# Altium PCB MainBoardPCB_4.PcbDoc (part 21 of 32)
Units mm, origin at the board's own origin, x right, y up, seen from the top; angles counter-clockwise.
Board outline 333.63 x 349.38 mm, 16 copper layers (L1, L2 (GND), L3 (Sign), L4 (GND), L5 (Sign), L6 (PWR/GND), L7(PWR/GND), L8 (Plane_GND), L9 (PWR/GND), L10 (PWR/GND), L11 (PWR/GND), L12 (Sign), L13 (GND), L14 (Sign), L15 (GND), L16), stack 2.502 mm thick; 2205 components, 1648 nets, 8314 pads, 3172 vias.
Unrouted connection lines stored in the file: 5141.
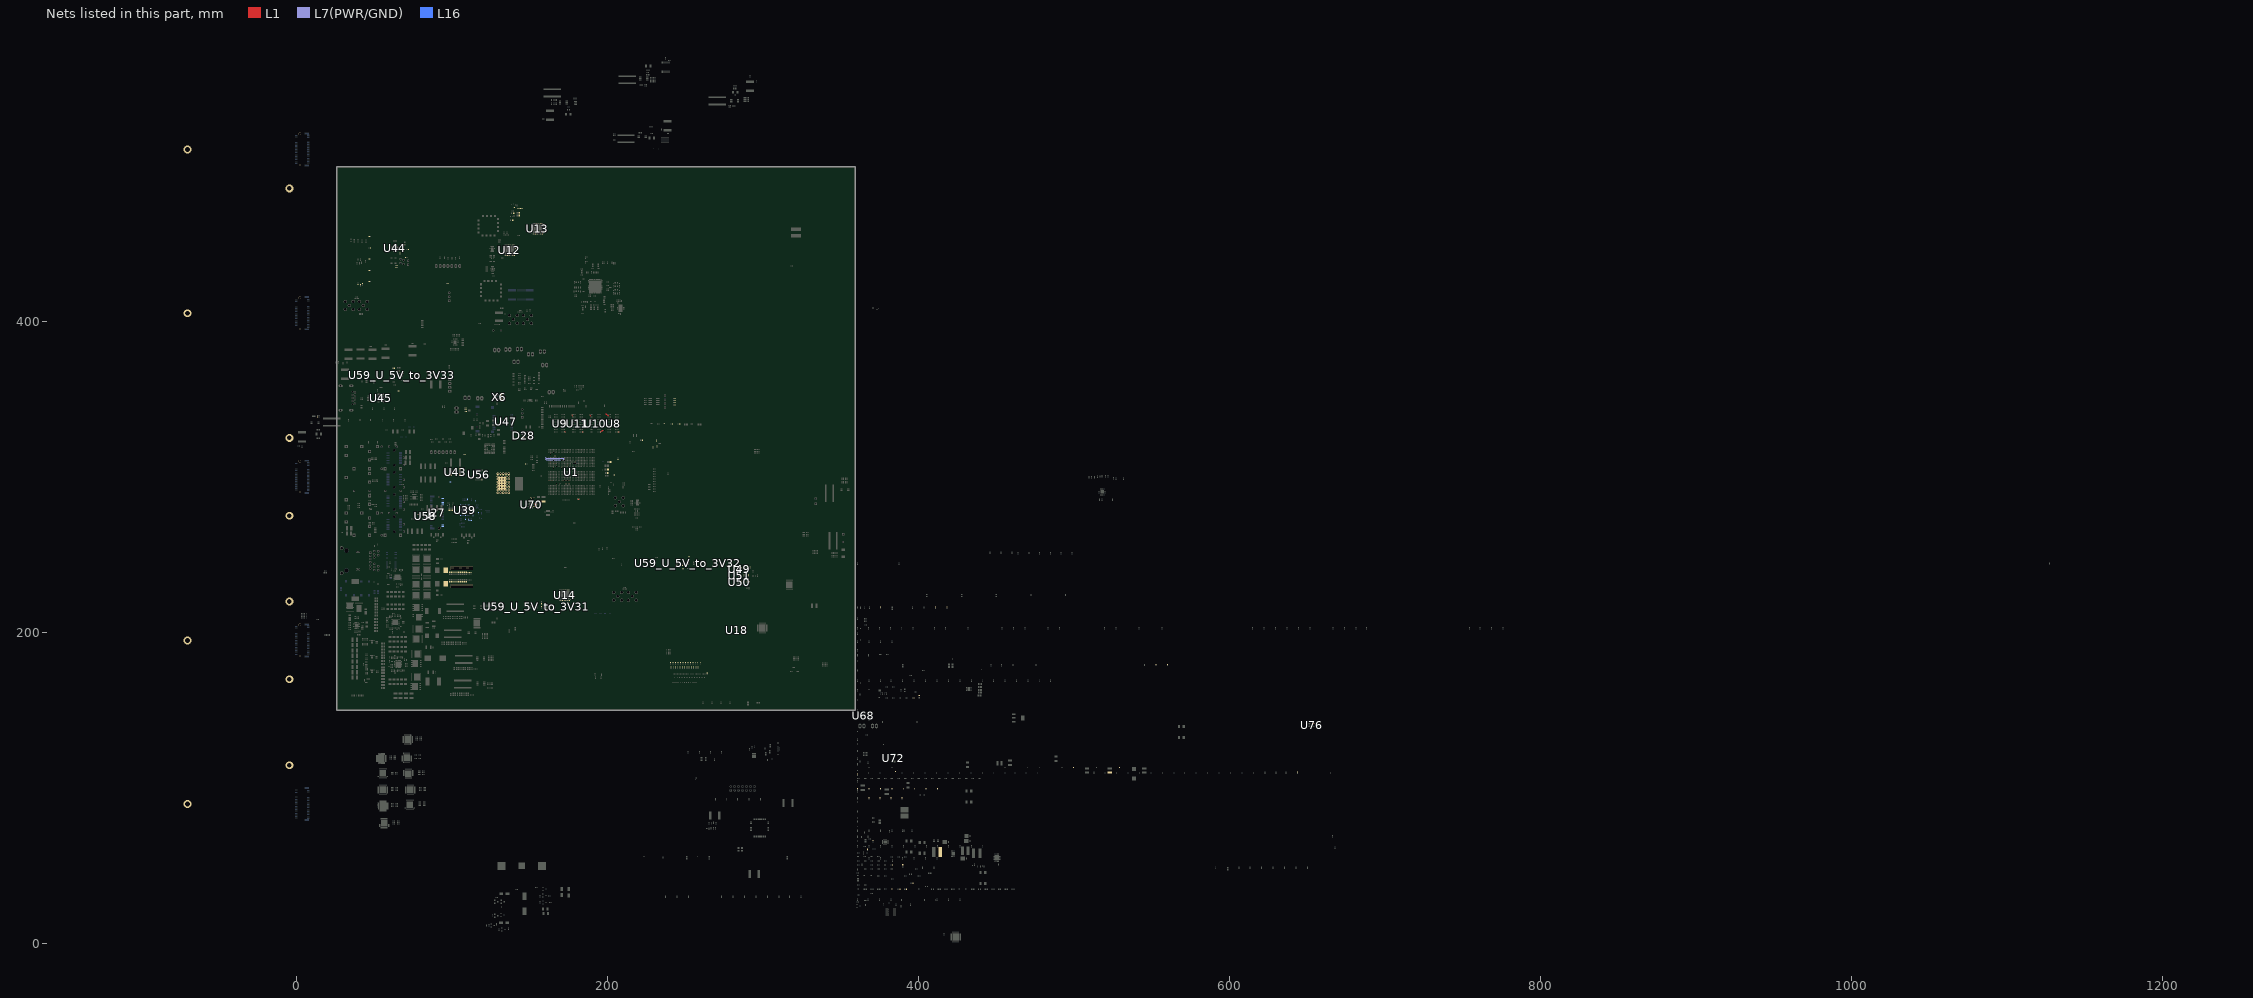
[diagram p21: the nets of this part, all layers, seen from the top]

## Part data (continued)
X1: library part CVCO55CC-2000-2000, Frequency=2GHz, Load Capacitance=22pF, Manufacturer=Crystek, Max Operating Temperature=85°C, Min Operating Temperature=-30°C, Operating Supply Voltage=8V, Package Quantity=1, Supplier Part Number 1=549-CVCO55CC20002000, ComponentLink1Description=https://datasheet.ciiva.com/12380/cvco55cc-2000-2000-218619-12380053.pdf?src-supplier=Mouser, ComponentLink1URL=https://datasheet.ciiva.com/12380/cvco55cc-2000-2000-218619-12380053.pdf?src-supplier=Mouser, ComponentLink2Description=https://datasheet.ciiva.com/6719/cvco55cc-2000-2000-6719815.pdf?src-supplier=Digi-Key, ComponentLink2URL=https://datasheet.ciiva.com/6719/cvco55cc-2000-2000-6719815.pdf?src-supplier=Digi-Key, Height=0.22inch, Length=0.5inch, Manufacturer Part Number=CVCO55CC-2000-2000, Packaging="Cut Tape", Pricing 1="1 = 32,65000, 5 = 31,16000, 10 = 28,20000, 25 = 26,71000, 50 = 25,23000, 100 = 22,26000 (USD)", RoHS=Yes, Stock 1=18, Supplier 1=Mouser, Termination=SMD/SMT, Width=0.5inch
X2: library part CVCO55CL-0490-0540, Case/Package=SMD/SMT, Frequency=540MHz, Load Capacitance=100pF, Manufacturer=Crystek, Max Operating Temperature=85°C, Max Supply Voltage=5.25V, Min Operating Temperature=-40°C, Min Supply Voltage=4.75V, Package Quantity=5, Supplier Part Number 1=744-1174-ND, ComponentLink1Description=https://datasheet.ciiva.com/884/cvco55cl-0490-0540-884171.pdf?src-supplier=Digi-Key, ComponentLink1URL=https://datasheet.ciiva.com/884/cvco55cl-0490-0540-884171.pdf?src-supplier=Digi-Key, ComponentLink2Description=https://datasheet.ciiva.com/12381/cvco55cl-0490-0540-32994-12381581.pdf?src-supplier=Mouser, ComponentLink2URL=https://datasheet.ciiva.com/12381/cvco55cl-0490-0540-32994-12381581.pdf?src-supplier=Mouser, ComponentLink3Description=https://datasheet.ciiva.com/14620/70051761-14620845.pdf?src-supplier=Allied+Electronics, ComponentLink3URL=https://datasheet.ciiva.com/14620/70051761-14620845.pdf?src-supplier=Allied+Electronics, Height=0.15inch, Length=0.5inch, Manufacturer Part Number=CVCO55CL-0490-0540, Mount="Surface Mount", Number of Pins=16, Packaging="Cut Tape", Pricing 1="1 = 24,31000, 5 = 23,20600, 10 = 20,99500, 25 = 19,89000, 50 = 18,78500 (USD)", RoHS=Yes, Stock 1=6, Supplier 1=Digi-Key, Termination=SMD/SMT, Width=0.5inch
X3: library part MP024S, "CRYSTAL 2.4576MHZ 32PF T/H", ESR (Equivalent Series Resistance)=300R, Frequency Stability=50ppm, Frequency Tolerance=30ppm, Load Capacitance=32pF, Manufacturer=CTS, Max Operating Temperature=70°C, Min Operating Temperature=-20°C, Package Quantity=100, Supplier Part Number 1=CTX069-ND, ComponentLink1Description=https://datasheet.ciiva.com/27056/2039161-27056418.pdf?src-supplier=Jameco, ComponentLink1URL=https://datasheet.ciiva.com/27056/2039161-27056418.pdf?src-supplier=Jameco, ComponentLink2Description=https://datasheet.ciiva.com/15116/getdatasheetpartid-123295-15116382.pdf?src-supplier=Verical, ComponentLink2URL=https://datasheet.ciiva.com/15116/getdatasheetpartid-123295-15116382.pdf?src-supplier=Verical, ComponentLink3Description=https://datasheet.ciiva.com/854/008-0308-0-854108.pdf?src-supplier=Digi-Key, ComponentLink3URL=https://datasheet.ciiva.com/854/008-0308-0-854108.pdf?src-supplier=Digi-Key, Depth=3.8mm, Frequency=2.4576MHz, Height=0.53inch, Lead Free="Lead Free", Length=10.85mm, Manufacturer Part Number=MP024S, Mount="Through Hole", Number of Pins=2, Packaging=Bulk, Pricing 1="1 = 1,14000, 10 = 1,08500, 50 = 1,05980, 100 = 0,90850, 500 = 0,88322, 1000 = 0,74443, 2500 = 0,70658, 5000 = 0,68135, 10000 = 0,65611 (USD)", Radiation Hardening=No, RoHS=Yes, Series Resistance=300R, Stock 1=2166, Supplier 1=Digi-Key, Termination=Radial, Tolerance=30ppm, Width=0.15inch
X4: "CRYSTAL 25.0000MHZ 18PF SMD", Case/Package=SMD/SMT, ESR (Equivalent Series Resistance)=50R, Frequency=25MHz, Frequency Stability=30ppm, Frequency Tolerance=50ppm, Load Capacitance=18pF, Manufacturer 1=Epson, Max Operating Temperature=70°C, Min Operating Temperature=-20°C, Package Quantity=250, Supplier Part Number 1=SER3691CT-ND, ComponentLink1Description=http://www.mouser.com/ds/2/137/A-238_en-932914.pdf?src-supplier=Mouser, ComponentLink1URL=http://www.mouser.com/ds/2/137/A-238_en-932914.pdf?src-supplier=Mouser, ComponentLink2Description=https://www5.epsondevice.com/en/information/support/pdf/june_2018_psc_masterbook.pdf?src-supplier=Digi-Key, ComponentLink2URL=https://www5.epsondevice.com/en/information/support/pdf/june_2018_psc_masterbook.pdf?src-supplier=Digi-Key, Height=0.028inch, Lead Free="Lead Free", Length=0.126inch, Manufacturer Part Number 1=FA-23825.0000MB-C3, Mount="Surface Mount", Packaging="Tape and Reel", Pricing 1="1=0,36000, 10=0,30300, 50=0,27220, 100=0,24200 (USD)", RoHS=Yes, Stock 1=39779, Supplier 1=Digi-Key, Termination=SMD/SMT, Tolerance=50ppm, Weight=0.000564oz, Width=0.098inch
X5: library part FC-13532.7680KA-A5, "CRYSTAL 32.7680 KHZ 12.5PF SMD", Case/Package=SMD/SMT, ESR (Equivalent Series Resistance)=70kR, Frequency Tolerance=20ppm, Load Capacitance=12.5pF, Manufacturer=Epson, Max Operating Temperature=85°C, Min Operating Temperature=-40°C, Supplier Part Number 1=SER4103CT-ND, Category=Crystals, ComponentLink1Description=https://support.epson.biz/td/api/doc_check.php?dl=brief_FC-135&lang=en&src-supplier=Digi-Key, ComponentLink1URL=https://support.epson.biz/td/api/doc_check.php?dl=brief_FC-135&lang=en&src-supplier=Digi-Key, ComponentLink2Description=https://www.eea.epson.com/wp-content/uploads/2016/11/November-2016-PCS-MASTER-BOOK.pdf?src-supplier=Digi-Key, ComponentLink2URL=https://www.eea.epson.com/wp-content/uploads/2016/11/November-2016-PCS-MASTER-BOOK.pdf?src-supplier=Digi-Key, Frequency=32.768kHz, Height=0.035inch, Length=0.126inch, Manufacturer Part Number=FC-13532.7680KA-A5, Mount="Surface Mount", Number of Pins=2, Packaging="Tape and Reel", Pricing 1="1=0,43000, 10=0,35800, 50=0,32180, 100=0,28600, 500=0,27170, 1000=0,22880 (USD)", RoHS=Yes, Series Resistance=70kR, Stock 1=101729, Supplier 1=Digi-Key, Width=0.061inch
X6: "SMD Crystal Oscillator 50MHz 3.3V 4-Pin SMD Tray", Case/Package=SMD/SMT, Frequency=50MHz, Frequency Stability=20ppm, Manufacturer="Silicon Labs", Operating Supply Voltage=3.3V, Package Quantity=1, Supplier Part Number 1=336-5245-ND, ComponentLink1Description=https://datasheet.ciiva.com/9292/+si510-11-9292588.pdf?src-supplier=Avnet, ComponentLink1URL=https://datasheet.ciiva.com/9292/+si510-11-9292588.pdf?src-supplier=Avnet, Length=5mm, Manufacturer Part Number=510CCA50M0000BAG, Packaging=Tray, Pricing 1="1 = 3,26000, 25 = 3,13800, 100 = 3,01710, 1000 = 2,62163 (USD)", RoHS=Yes, Stock 1=247, Supplier 1=Digi-Key, Weight=0.001764oz, Width=3.2mm
X7: "CRYSTAL 24.00 MHZ 9.0PF SMD", Case/Package=SMD/SMT, ESR (Equivalent Series Resistance)=40R, Frequency=24MHz, Frequency Stability=15ppm, Frequency Tolerance=10ppm, Load Capacitance=9pF, Manufacturer 1=Epson, Max Operating Temperature=85°C, Min Operating Temperature=-40°C, Supplier Part Number 1=SER4180DKR-ND, ComponentLink1Description=https://www5.epsondevice.com/en/information/support/pdf/june_2018_psc_masterbook.pdf?src-supplier=Digi-Key, ComponentLink1URL=https://www5.epsondevice.com/en/information/support/pdf/june_2018_psc_masterbook.pdf?src-supplier=Digi-Key, Height=0.024inch, Lead Free="Lead Free", Length=0.126inch, Manufacturer Part Number 1=TSX-322524.0000MF15X-AC6, Mount="Surface Mount", Packaging="Tape and Reel", Pricing 1="1=0,36000, 10=0,30300, 50=0,27220, 100=0,24200, 500=0,22990, 1000=0,19360 (USD)", RoHS=Yes, Stock 1=33708, Supplier 1=Digi-Key, Width=0.098inch
X8: Manufacturer 1="ECS International", Supplier Part Number 1=XC2904CT-ND, Manufacturer Part Number 1=ECS-120-8-33-RWY-TR, Pricing 1="1=0,56000, 10=0,46500, 50=0,41820, 100=0,37180, 500=0,35322 (USD)", RoHS=No, Stock 1=526, Supplier 1=Digi-Key
X9: "OSC MEMS 48.0000MHZ LVCMOS SMD", Case/Package=SMD/SMT, Frequency=48MHz, Frequency Stability=25ppm, Manufacturer=SiTime, Max Operating Temperature=85°C, Max Supply Current=4.5mA, Min Operating Temperature=-40°C, Supplier Part Number 1=1473-30890-1-ND, Category=Oscillators, ComponentLink1Description=https://www.sitime.com/products/datasheets/sit1602/SiT1602B-datasheet.pdf?src-supplier=Digi-Key, ComponentLink1URL=https://www.sitime.com/products/datasheets/sit1602/SiT1602B-datasheet.pdf?src-supplier=Digi-Key, Height=0.032inch, Length=0.098inch, Manufacturer Part Number=SIT1602BI-12-33E-48.000000G, Mount="Surface Mount", Packaging="Tape and Reel", Pricing 1="1=1,36000, 10=1,30100, 50=1,27060, 100=1,08900 (USD)", RoHS=Yes, Stock 1=283, Supplier 1=Digi-Key, Width=0.079inch
P7 P8 P9 P10: LatestRevisionDate=17-Jul-2002, LatestRevisionNote="Re-released for DXP Platform.", Publisher="Altium Limited"

## Via types
v1: diameter 0.5, hole 0.2, L1 to L16, tented both sides, 1153 vias
v2: diameter 0.5/0.35/0.35/0.35/0.35/0.35/0.35/0.35/0.35/0.35/0.35/0.35/0.35/0.35/0.35/0.5 (per signal layer), hole 0.2, L1 to L16, tented both sides, 548 vias
v3: diameter 0.5, hole 0.2, L1 to L16, 522 vias
v4: diameter 0.5/0.35/0.35/0.35/0.35/0.35/0.35/0.35/0.35/0.35/0.35/0.35/0.35/0.35/0.35/0.5 (per signal layer), hole 0.15, L1 to L16, tented both sides, 266 vias
v5: diameter 0.8, hole 0.4, L1 to L16, tented both sides, 164 vias
v6: diameter 0.35/0/0.35 (per signal layer), hole 0.127, L1 to L3 (Sign), tented both sides, 132 vias
v7: diameter 2.54, hole 1.02, L1 to L16, 125 vias
v8: diameter 1.4, hole 0.5, L1 to L16, tented both sides, 80 vias
v9: diameter 0.35, hole 0.127, L1 to L2 (GND), tented both sides, 36 vias
v10: diameter 0.4, hole 0.2, L1 to L16, 16 vias
v11: diameter 0.25, hole 0.2, L1 to L16, 16 vias
v12: diameter 5, hole 3, L1 to L16, 15 vias
v13: diameter 0.3, hole 0.2, L1 to L16, 15 vias
v14: diameter 0.45, hole 0.15, L1 to L16, 12 vias
v15: diameter 0.5/0.35/0.35/0.35/0.35/0.35/0.35/0.35/0.35/0.35/0.35/0.35/0.35/0.35/0.35/0.45 (per signal layer), hole 0.15, L1 to L16, tented both sides, 10 vias
v16: diameter 0.2/0/0.2 (per signal layer), hole 0.1, L1 to L3 (Sign), tented both sides, 9 vias
v17: diameter 0.4, hole 0.1, L1 to L16, 7 vias
v18: diameter 0.5, hole 0.2, L3 (Sign) to L6 (PWR/GND), tented both sides, 6 vias
v19: diameter 1.65, hole 1.65, L1 to L16, 6 vias
v20: diameter 1.15, hole 1.15, L1 to L16, 6 vias
v21: diameter 0.35/0/0.35 (per signal layer), hole 0.127, L14 (Sign) to L16, tented both sides, 5 vias
v22: diameter 0.2, hole 0.1, L1 to L16, 4 vias
v23: diameter 0.4, hole 0.2, L1 to L16, tented both sides, 2 vias
v24: diameter 0.4, hole 0.15, L1 to L16, 2 vias
v25: diameter 0.508, hole 0.127, L1 to L2 (GND), 2 vias
v26: diameter 0.508, hole 0.127, L2 (GND) to L3 (Sign), 2 vias
v27: diameter 0.5/0.35/0.35/0.35/0.35/0.35/0.35/0.35/0.35/0.35/0.35/0.35/0.35/0.35/0.35/0.5 (per signal layer), hole 0.15, L1 to L16, 2 vias
v28: diameter 0.35, hole 0.127, L3 (Sign) to L6 (PWR/GND), tented both sides, 2 vias
v29: diameter 5.5, hole 3.5, L1 to L16, 1 vias
v30: diameter 0.5/0.35/0.35/0.35/0.35/0.35/0.35/0.35/0.35/0.35/0.35/0.35/0.35/0.35/0.35/0.5 (per signal layer), hole 0.2, L1 to L16, 1 vias
v31: diameter 0.35/0.35/0.35 (per signal layer), hole 0.127, L1 to L3 (Sign), tented both sides, 1 vias
v32: diameter 0.45/0/0.45 (per signal layer), hole 0.15, L1 to L3 (Sign), tented both sides, 1 vias
v33: diameter 0.45/0/0.45 (per signal layer), hole 0.2, L14 (Sign) to L16, tented both sides, 1 vias
v34: diameter 0.35, hole 0.127, L2 (GND) to L3 (Sign), 1 vias
v35: diameter 0.35, hole 0.127, L1 to L2 (GND), 1 vias

## Nets (pads, with @x,y where several pads share a name; then routed paths per layer and width w, separated by ;. In a path a pad name is that pad's centre, name@x,y a point inside that pad or via, vN(x,y) a via of type N, cw(c..) or ccw(c..) an arc to the next point about the centre after c; other vN are vias at no path point)
0.85V@40A_INA: C359.2 C360.2 C361.2 C362.2 C363.2 C364.2 C365.2 C366.2 C367.2 C368.2 C369.2 C370.2 C377.2 C378.2 C379.2 C380.2 C381.2 C382.2 C383.2 C384.2 C385.2 C386.2 C387.2 C388.2 L9.2 L10.2 R617.1 U72.10 | length 0.2
  L7(PWR/GND) w0.3: 116.278,181.956 116.278,182.159
  other v1: 99.543,228.727 100.232,228.727 100.922,228.727 101.612,228.727 102.302,228.727 102.991,228.727 103.681,228.727 104.371,228.727 105.061,228.727 105.75,228.727 106.44,228.727 107.13,228.727 107.82,228.727 108.509,228.727 109.199,228.727 109.889,228.727 110.579,228.727 111.268,228.727 111.958,228.727 112.648,228.727 113.338,228.727 99.554,229.517 100.244,229.517 100.933,229.517 101.623,229.517 102.313,229.517 103.003,229.517 103.693,229.517 104.382,229.517 105.072,229.517 105.762,229.517 106.452,229.517 107.141,229.517 107.831,229.517 108.521,229.517 109.211,229.517 109.9,229.517 110.59,229.517 111.28,229.517 111.97,229.517 112.659,229.517 113.349,229.517 99.554,230.34 100.244,230.34 100.933,230.34 101.623,230.34 102.313,230.34 103.003,230.34 103.693,230.34 104.382,230.34 105.072,230.34 105.762,230.34 106.452,230.34 107.141,230.34 107.831,230.34 108.521,230.34 109.211,230.34 109.9,230.34 110.59,230.34 111.28,230.34 111.97,230.34 112.659,230.34 113.349,230.34 99.543,240.424 100.232,240.424 100.922,240.424 101.612,240.424 102.302,240.424 102.991,240.424 103.681,240.424 104.371,240.424 105.061,240.424 105.75,240.424 106.44,240.424 107.13,240.424 107.82,240.424 108.509,240.424 109.199,240.424 109.889,240.424 110.579,240.424 111.268,240.424 111.958,240.424 112.648,240.424 113.338,240.424 99.554,241.214 100.244,241.214 100.933,241.214 101.623,241.214 102.313,241.214 103.003,241.214 103.693,241.214 104.382,241.214 105.072,241.214 105.762,241.214 106.452,241.214 107.141,241.214 107.831,241.214 108.521,241.214 109.211,241.214 109.9,241.214 110.59,241.214 111.28,241.214 111.97,241.214 112.659,241.214 113.349,241.214 99.554,242.037 100.244,242.037 100.933,242.037 101.623,242.037 102.313,242.037 103.003,242.037 103.693,242.037 104.382,242.037 105.072,242.037 105.762,242.037 106.452,242.037 107.141,242.037 107.831,242.037 108.521,242.037 109.211,242.037 109.9,242.037 110.59,242.037 111.28,242.037 111.97,242.037 112.659,242.037 113.349,242.037
  other v8: 129.565,289.776 131.318,289.776 133.071,289.776 134.823,289.776 136.576,289.776 129.565,291.529 131.318,291.529 133.071,291.529 134.823,291.529 136.576,291.529 129.565,293.282 131.318,293.282 133.071,293.282 134.823,293.282 136.576,293.282 129.565,295.034 131.318,295.034 133.071,295.034 134.823,295.034 136.576,295.034 129.565,296.787 131.318,296.787 133.071,296.787 134.823,296.787 136.576,296.787 129.565,298.539 131.318,298.539 133.071,298.539 134.823,298.539 136.576,298.539 129.565,300.292 131.318,300.292 133.071,300.292 134.823,300.292 136.576,300.292 129.565,302.045 131.318,302.045 133.071,302.045 134.823,302.045 136.576,302.045
  other v12: -69.975,89.581 -4.475,114.582 -4.475,169.813 -69.975,194.813 -4.475,219.813 -4.475,275.045 -4.475,325.045 -69.975,405.276 -4.475,485.508 -69.975,510.508
  other v19: 2.275,204.813 91.921,267.021 2.275,310.045 2.275,415.276 2.275,520.508
  other v20: 2.275,184.813 91.921,287.021 2.275,290.045 2.275,395.276 2.275,500.508
0V9@1A_REG3: C709.2 C710.2 R673.2 U1.A10 U1.C10 U1.F8 U1.H8 U1.M8 U1.P8 U70.11 U70.12 | length 2.8
  L1 w0.3: U70.11@152.889,281.004 v5(153.784,281.004) v5@153.797,281.004 ; U70.12@152.889,281.504 v5(154.745,281.503)
  other v2: 167.397,295.539 169.397,295.539 173.397,295.539 175.397,295.539 162.397,297.539 164.397,297.539
  other v5: 151.752,286.093 150.812,286.74 152.781,286.779
0V85@2A: C675.2 C746.2 FB45.2 U1.J23 U1.L23 | length 24.2
  L7(PWR/GND) w0.254: 160.122,311.721 160.769,311.074 169.862,311.074 v2(170.397,310.539) ; 160.223,312.509 160.706,312.026 171.59,312.026 171.907,311.709 171.907,311.029 v2(172.397,310.539)
1V0@1.5A: C505.2 C506.2 C507.2 C508.2 C509.2 C510.2 C511.2 C512.2 C513.2 C514.2 C555.2 R397.2 U39.6 U39.24 U39.31 U39.42 U51.8
1V8@0.5A_ADC_filtered: C705.2 C706.2 C749.2 C750.2 C757.1 C758.2 D28.3 FB38.1 FB40.1 FB42.1 R671.2 R694.1 R745.2 U1.K10 U1.L10 U1.M10 U1.N10 U1.P10 U1.T22 U1.U21 U1.V21 U1.V22 U70.14 U70.15 | length 3.6
  L1 w0.254: C706.2@181.152,285.703 v2(182.038,285.703)
  L1 w0.3: U70.14@152.889,282.504 v5(154.745,282.504) ; U70.15@152.889,283.003 v5(153.784,283.003) v5@153.797,283.003
  other v2: 171.397,297.539 172.397,297.539 173.397,297.539 174.397,297.539 175.397,297.539 178.397,308.539 179.397,308.539 177.397,309.539 179.397,309.539
1V8@1.5A: C485.2 C486.2 C487.2 C488.2 C489.2 C490.2 C553.2 C561.2 C729.2 C730.2 R394.2 U39.13 U39.48 U45.28 U45.30 U50.8 U58.8
2V5@1.5A: C499.2 C500.2 C501.2 C502.2 C503.2 C504.2 C551.2 C782.2 C783.2 C784.2 C785.2 C786.2 C787.2 C788.2 C789.2 R391.2 R392.2 U8.B1 U8.R6 U9.B1 U9.R6 U10.B1 U10.R6 U11.B1 U11.R6 U39.3 U39.9 U49.8 | length 8.4
  L1 w0.2: U8.B1@206.857,328.86 v4(207.785,328.86)
  L1 w0.25: U9.B1@172.476,328.86 v4(172.879,328.457) ; v4(177.133,339.664) U11.R6@177.536,339.26 ; U11.B1@183.936,328.86 v4(184.507,328.86) ; v4(188.593,339.664) U10.R6@188.997,339.26
  L1 w0.254: 199.032,340.739 199.094,340.676 199.094,340.623 U8.R6@200.457,339.26
  L1 w0.3: U10.B1@195.397,328.86 195.841,328.86 196.888,329.908 198.022,329.908 198.044,329.886 v1(198.044,329.87)
  L16 w0.3: v1(198.044,329.87) v1@198.044,329.895
3.3V_LN_1: C55.2 C56.2 C59.2 C60.2 C65.2 C66.2 C71.2 C72.2 C84.2 C85.2 C94.2 C95.2 C569.2 FB2.1 FB3.1 FB4.1 FB5.1 FB6.1 FB7.1 FB33.2
3.3V_PS_Config: C491.2 C492.2 C493.2 C494.2 C495.2 C496.2 C497.2 C498.2 C531.1 C547.2 C612.2 C613.2 C614.2 C615.2 C742.1 C743.2 C790.2 L17.2 R83.2 R84.2 R85.2 R86.2 R97.2 R98.2 R99.2 R106.1 R123.2 R216.1 R319.2 R320.2 R322.2 R323.2 R333.1 R336.1 R337.1 R338.1 R346.1 R347.1 R348.1 R349.2 R350.2 R351.2 R352.2 R353.1 R354.2 R355.1 R356.1 R357.2 R367.2 R368.2 R369.2 R370.2 R371.2 R372.2 R381.2 R382.2 R709.1 R710.2 R715.2 R716.2 R717.2 R718.2 R719.2 R737.2 U1.B22 U1.B27 U1.D18 U1.D23 U1.D28 U1.E21 U1.E26 U1.F19 U1.J18 U1.N20 U1.P18 U39.19 U39.30 U39.41 U43.1 U43.2 U43.7 U43.8 U43.15 U43.16 U44.1 U47.B3 U47.C4 U56.15 U68.3 U76.5 X6.1 X6.4
  other v2: 165.397,305.539 170.397,305.539 175.397,305.539 167.397,306.539 174.397,307.539 166.397,308.539 163.397,309.539 165.397,310.539 166.397,313.539 163.397,314.539 165.397,315.539
3.3V_Stable_1: C149.2 C150.2 C151.2 C152.2 C153.2 C154.2 C155.2 C156.2 C157.2 C158.2 C159.2 C160.2 C161.2 C181.2 C182.2 C183.2 C184.2 C185.2 C186.2 C187.2 C188.2 C189.2 C190.2 C191.2 C192.2 C193.2 C565_U_5V_to_3V33.2 C566_U_5V_to_3V33.2 C567_U_5V_to_3V33.2 R430_U_5V_to_3V33.2 R431_U_5V_to_3V33.2 U12.2 U12.5 U12.8 U12.11 U12.14 U12.17 U12.20 U12.23 U12.26 U12.29 U12.32 U12.35 U59_U_5V_to_3V33.8
3.3V_Stable_2: C166.2 C167.2 C168.2 C169.2 C170.2 C171.2 C172.2 C173.2 C174.2 C175.2 C176.2 C177.2 C178.2 C194.2 C195.2 C196.2 C197.2 C198.2 C199.2 C200.2 C201.2 C202.2 C203.2 C204.2 C205.2 C206.2 C565_U_5V_to_3V32.2 C566_U_5V_to_3V32.2 C567_U_5V_to_3V32.2 R430_U_5V_to_3V32.2 R431_U_5V_to_3V32.2 U13.2 U13.5 U13.8 U13.11 U13.14 U13.17 U13.20 U13.23 U13.26 U13.29 U13.32 U13.35 U59_U_5V_to_3V32.8
3.3V_Stable_3: C111.2 C112.2 C113.2 C114.2 C115.2 C116.2 C117.2 C118.2 C119.2 C120.2 C121.2 C122.2 C123.2 C128.2 C129.2 C130.2 C131.2 C132.2 C133.2 C134.2 C135.2 C136.2 C137.2 C138.2 C139.2 C140.2 C565_U_5V_to_3V31.2 C566_U_5V_to_3V31.2 C567_U_5V_to_3V31.2 R430_U_5V_to_3V31.2 R431_U_5V_to_3V31.2 U14.2 U14.5 U14.8 U14.11 U14.14 U14.17 U14.20 U14.23 U14.26 U14.29 U14.32 U14.35 U59_U_5V_to_3V31.8
3.3Vaux: C332.2 J27.2 J27.4 J27.12 J27.14 J27.16 J27.18 J27.62 J27.64 J27.66 U18.C2 U18.D1 U18.D2 U18.E1 U18.E2 U18.F1 U18.F2